# Altium PCB ACF_Out-v2.0.PcbDoc (part 2 of 3)
Units mm, origin at the board's own origin, x right, y up, seen from the top; angles counter-clockwise.
Board outline 145.27 x 100 mm, 2 copper layers (Top Layer, Bottom Layer), stack 1.57 mm thick; 63 components, 69 nets, 230 pads, 136 vias.
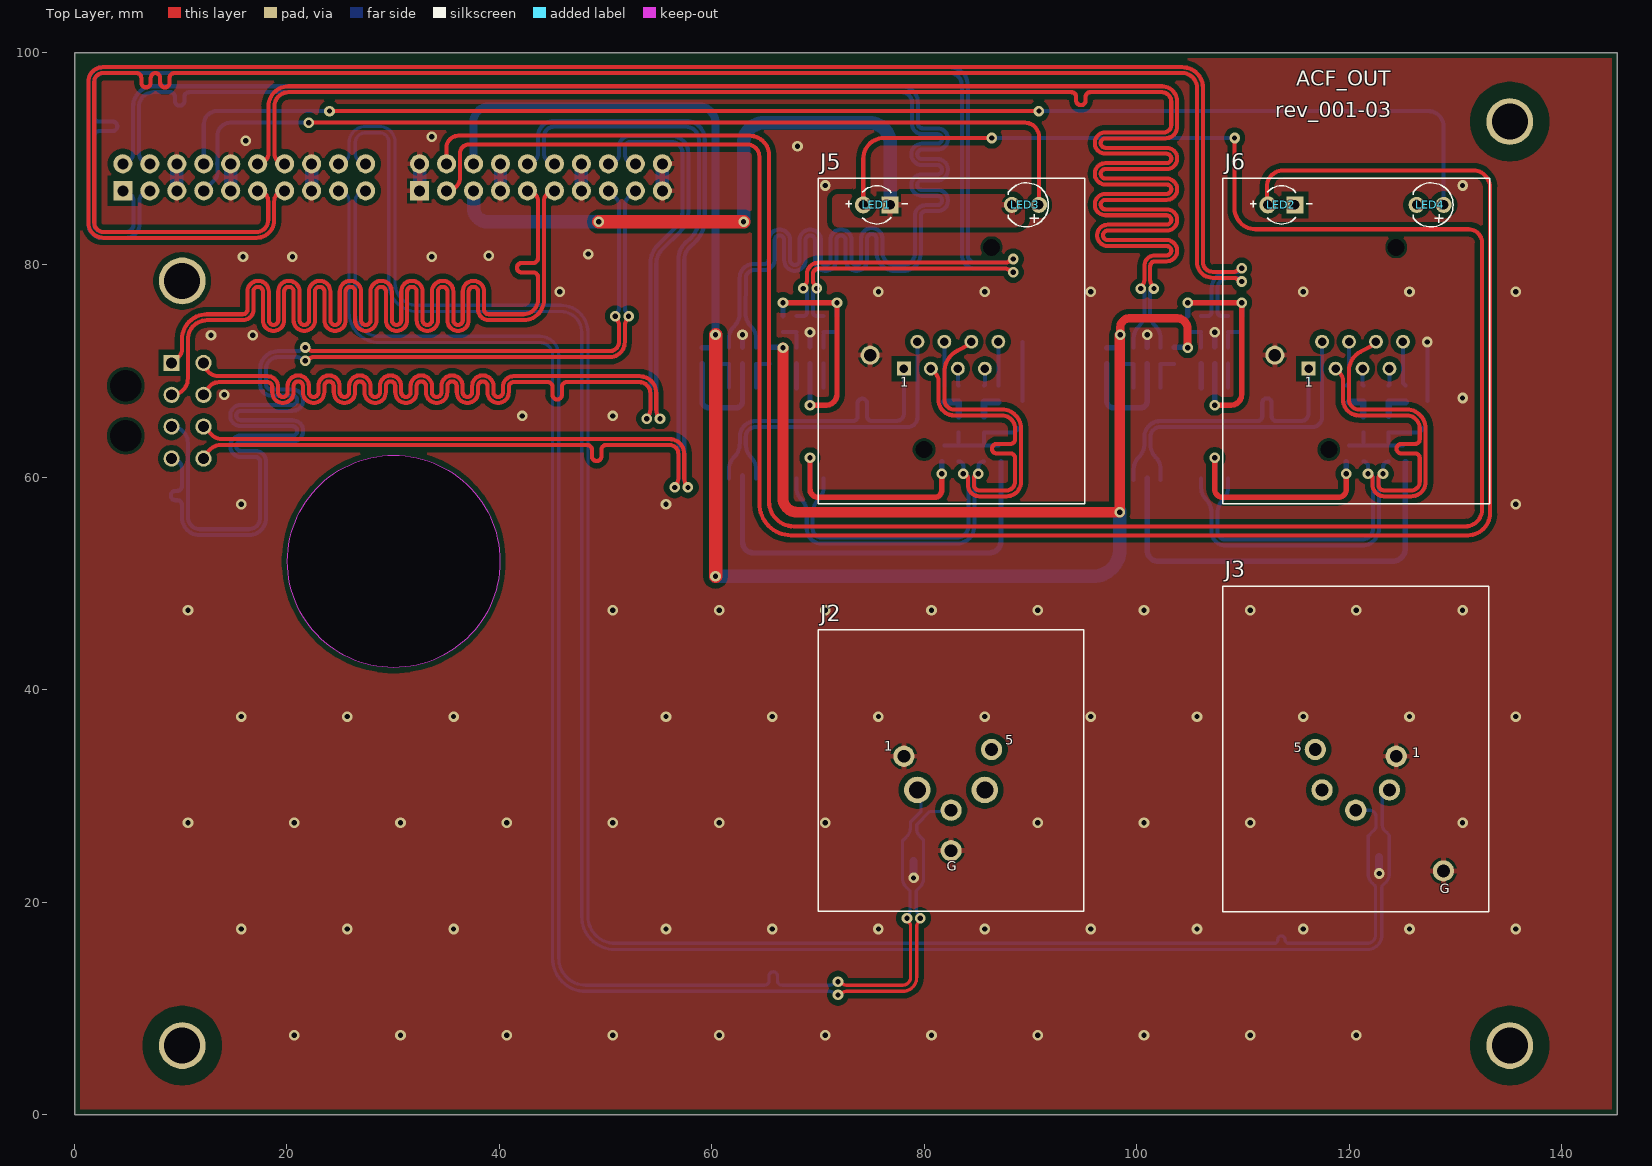
[diagram p0: Top Layer view]

## Via types
v1: diameter 1, hole 0.5, Top Layer to Bottom Layer, tented both sides, 136 vias

## Nets (pads, with @x,y where several pads share a name; then routed paths per layer and width w, separated by ;. In a path a pad name is that pad's centre, name@x,y a point inside that pad or via, vN(x,y) a via of type N, cw(c..) or ccw(c..) an arc to the next point about the centre after c; other vN are vias at no path point) (continued)
GND: (continued)
  Bottom Layer w0.508: C3.1@62.893,72.235 v1(62.893,73.417) ; C7.1@69.243,72.274 v1@69.243,73.417 ; C8.1@100.993,72.235 v1(100.993,73.417) ; C12.1@107.343,72.274 v1(107.343,73.671)
  Bottom Layer w0.762: v1@78.994,22.291 D2.3@78.994,23.855 ; v1@122.837,22.709 D1.3@122.837,24.273
  Bottom Layer w1.27: J1.05@9.626,86.984 J1.06@9.626,89.524 ; J1.09@14.706,86.984 J1.10@14.706,89.524 ; J1.15@22.326,86.984 J1.16@22.326,89.524 ; J4.01@32.486,86.984 J4.02@32.486,89.524 ; J4.07@40.106,86.984 J4.08@40.106,89.524 ; J4.13@47.726,86.984 J4.14@47.726,89.524 ; J4.19@55.346,86.984 J4.20@55.346,89.524
  other v1: 20.688,7.478 30.688,7.478 40.688,7.478 50.688,7.478 60.688,7.478 70.688,7.478 80.688,7.478 90.688,7.478 100.688,7.478 110.688,7.478 120.688,7.478 15.688,17.478 25.688,17.478 35.688,17.478 55.688,17.478 65.688,17.478 75.688,17.478 85.688,17.478 95.688,17.478 105.688,17.478 115.688,17.478 125.688,17.478 135.688,17.478 78.997,22.287 122.84,22.705 10.688,27.478 20.688,27.478 30.688,27.478 40.688,27.478 50.688,27.478 60.688,27.478 70.688,27.478 90.688,27.478 100.688,27.478 110.688,27.478 130.688,27.478 15.688,37.478 25.688,37.478 35.688,37.478 55.688,37.478 65.688,37.478 75.688,37.478 85.688,37.478 95.688,37.478 105.688,37.478 115.688,37.478 125.688,37.478 135.688,37.478 10.688,47.478 50.688,47.478 60.688,47.478 70.688,47.478 80.688,47.478 90.688,47.478 100.688,47.478 110.688,47.478 120.688,47.478 130.688,47.478 15.688,57.478 55.688,57.478 135.688,57.478 42.164,65.786 50.688,65.786 130.688,67.478 14.085,67.775 12.843,73.37 16.765,73.37 69.243,73.671 45.688,77.478 75.688,77.478 85.688,77.478 95.688,77.478 115.688,77.478 125.688,77.478 135.688,77.478 15.864,80.772 20.515,80.772 33.64,80.772 39.003,80.856 48.367,81.026 70.688,87.478 130.688,87.478 68.072,91.186 16.119,91.694 33.638,92.066
GND_DRIVE: J4.05 LED1.1 LED2.1 LED3.2 LED4.2 | length 57
  Top Layer w0.762: v1(62.992,84.06) v1@62.992,84.074
  Top Layer w1.27: v1(49.366,84.074) v1@62.992,84.074
  Bottom Layer w1.27: J4.05@37.566,86.984 37.566,85.37 ccw(c38.862,85.37) 38.862,84.074 v1(49.366,84.074) ; v1(62.992,84.06) 62.992,91.474 cw(c64.914,91.474) 64.914,93.396 74.821,93.396 cw(c74.821,91.417) 76.8,91.417 LED1.1@76.8,85.655